# Altium PCB NeoLink Basic Main Board.PcbDoc (part 5 of 5)
Units mm, origin at the board's own origin, x right, y up, seen from the top; angles counter-clockwise.
Board outline 70 x 115 mm, 6 copper layers (Top Layer, Layer 2, Layer 3, Layer 4, Layer 5, Bottom Layer), stack 1.148 mm thick; 467 components, 265 nets, 1397 pads, 1169 vias.
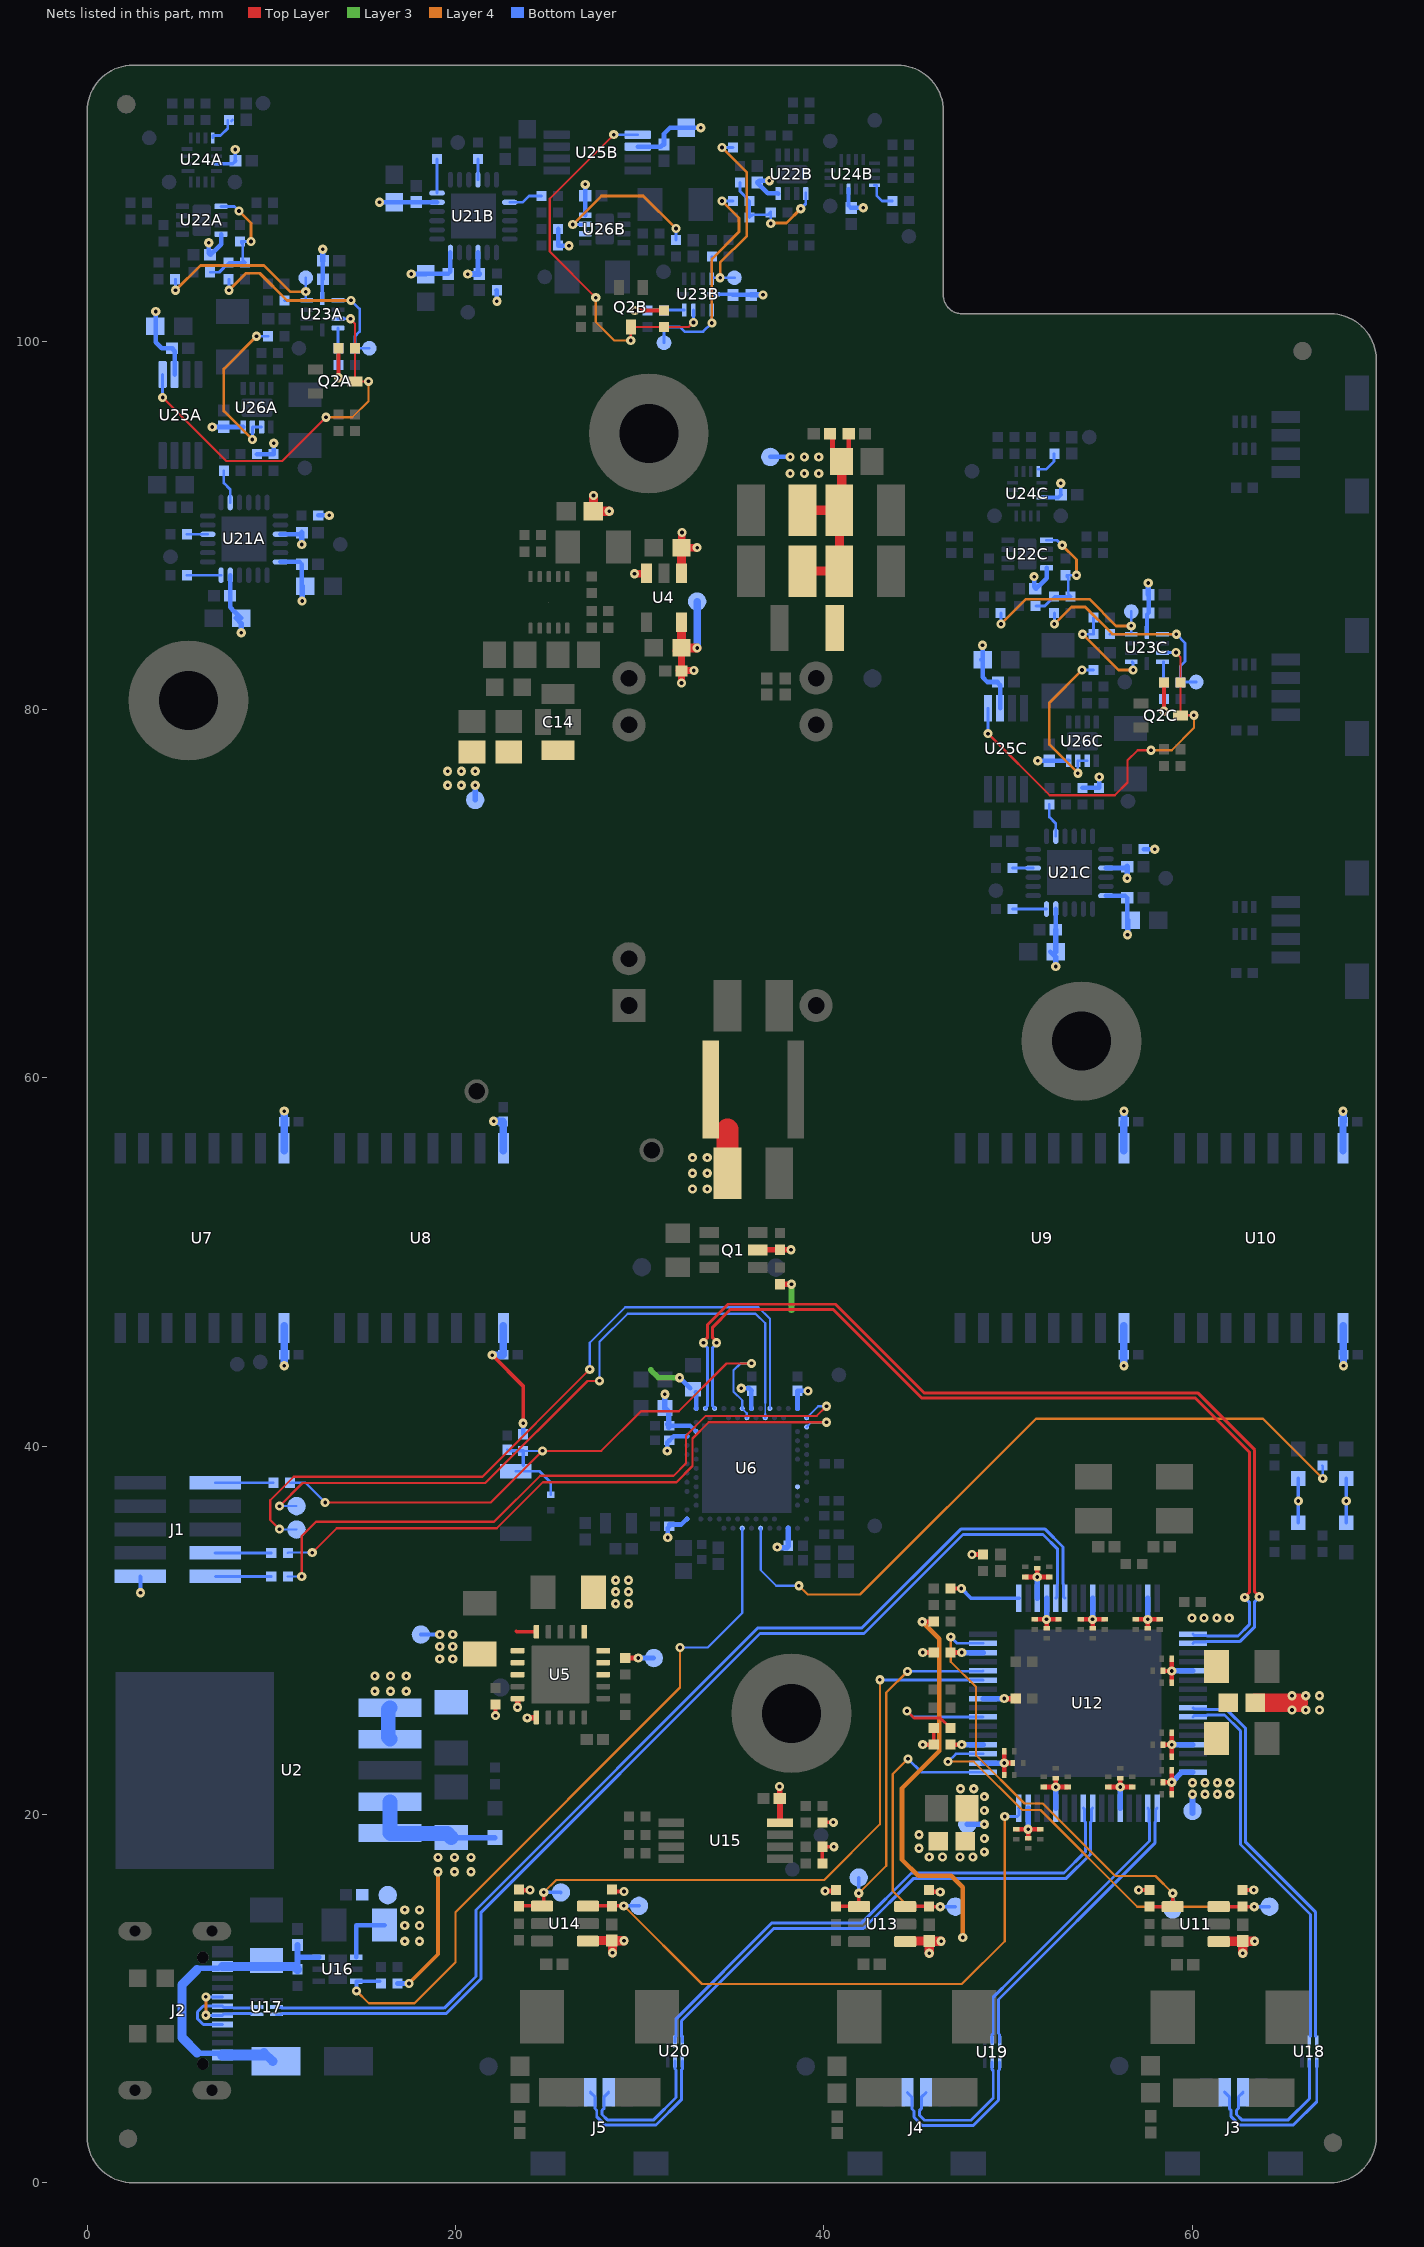
[diagram p8: the nets of this part, all layers, seen from the top]

## Via types
v1: diameter 0.5, hole 0.2, Top Layer to Bottom Layer, tented both sides, 1097 vias
v2: diameter 0.8, hole 0.4, Top Layer to Bottom Layer, tented both sides, 32 vias
v3: diameter 0.5, hole 0.2, Top Layer to Bottom Layer, 24 vias
v4: diameter 0.6, hole 0.3, Top Layer to Bottom Layer, 16 vias

## Nets (pads, with @x,y where several pads share a name; then routed paths per layer and width w, separated by ;. In a path a pad name is that pad's centre, name@x,y a point inside that pad or via, vN(x,y) a via of type N, cw(c..) or ccw(c..) an arc to the next point about the centre after c; other vN are vias at no path point) (continued)
NetR66C_2: R66C.2 R67C.1 U23C.6 | length 5.5
  Layer 4 w0.15: v1(54.05,84.1) 56,82.15 v1(56.8,82.15)
  Bottom Layer w0.15: v1(54.05,84.1) R67C.1@54.65,84.1 R66C.2@54.65,85 ; U23C.6@56.75,82.6 56.8,82.55 v1(56.8,82.15)
NetR67A_2: R67A.2 R74A.1 TP30A.1 U23A.9 | length 11.3
  Layer 4 w0.15: v1(4.8,102.775) 6.15,104.125 9.6,104.125 11.025,102.7 v1(11.875,102.7)
  Bottom Layer w0.15: v1(4.8,102.775) R74A.1@4.8,103.375 ; R67A.2@10.725,102.225 U23A.9@11.925,102.225 11.875,102.275 v1(11.875,102.7) TP30A.1@11.875,103.45
NetR67B_2: R67B.2 R74B.1 TP30B.1 U23B.9 | length 11.3
  Layer 4 w0.15: v1(34.375,103.45) 34.375,104.275 35.825,105.725 35.825,109.175 v1(34.475,110.525)
  Bottom Layer w0.15: R67B.2@33.925,104.6 U23B.9@33.925,103.4 33.975,103.45 v1(34.375,103.45) TP30B.1@35.15,103.45 ; v1(34.475,110.525) R74B.1@35.075,110.525
NetR67C_2: R67C.2 R74C.1 TP30C.1 U23C.9 | length 11.3
  Layer 4 w0.15: v1(49.625,84.65) 50.975,86 54.425,86 55.875,84.55 v1(56.7,84.55)
  Bottom Layer w0.15: v1(49.625,84.65) R74C.1@49.625,85.25 ; R67C.2@55.55,84.1 56.75,84.1 56.7,84.15 v1(56.7,84.55) TP30C.1@56.7,85.325
NetR68A_1: R68A.1 U21A.14 | length 1.9
  Bottom Layer w0.15: R68A.1@7.425,92.975 7.425,92.3 7.775,91.95 U21A.14@7.775,91.25
NetR68B_1: R68B.1 U21B.14 | length 1.9
  Bottom Layer w0.15: U21B.14@22.95,107.55 23.65,107.55 24,107.9 R68B.1@24.675,107.9
NetR68C_1: R68C.1 U21C.14 | length 1.9
  Bottom Layer w0.15: R68C.1@52.25,74.85 52.25,74.175 52.6,73.825 U21C.14@52.6,73.125
NetR70A_1: R70A.1 U21A.6 | length 1.8
  Bottom Layer w0.15: R70A.1@5.425,87.3 U21A.6@7.275,87.3
NetR70B_1: R70B.1 U21B.6 | length 1.8
  Bottom Layer w0.15: U21B.6@19,108.05 R70B.1@19,109.9
NetR70C_1: R70C.1 U21C.6 | length 1.8
  Bottom Layer w0.15: R70C.1@50.25,69.175 U21C.6@52.1,69.175
NetR73A_1: R73A.1 U21A.10 | length 1.1
  Bottom Layer w0.15: R73A.1@5.425,89.525 U21A.10@6.55,89.525
NetR73B_1: R73B.1 U21B.10 | length 1.1
  Bottom Layer w0.15: U21B.10@21.225,108.775 R73B.1@21.225,109.9
NetR73C_1: R73C.1 U21C.10 | length 1.1
  Bottom Layer w0.15: R73C.1@50.25,71.4 U21C.10@51.375,71.4
NetR76A_2: R76A.2 R80A.2 R83A.1 R85A.1 U22A.5 | length 6.9
  Layer 4 w0.15: v1(8.25,107.075) 8.9,106.425 v1@8.9,105.35
  Bottom Layer w0.15: R76A.2@6.7,103.75 7.175,103.75 7.7,104.275 8.6,104.275 8.45,104.425 8.45,105.275 R85A.1@8.375,105.35 ; U22A.5@7.275,107.325 8,107.325 v1(8.25,107.075) v1@8.237,107.075 ; R85A.1@8.375,105.425 v1(8.9,105.425)
NetR76B_2: R76B.2 R80B.2 R83B.1 R85B.1 U22B.5 | length 6.9
  Layer 4 w0.15: v1@37.125,106.425 37.975,106.425 v1(38.75,107.2)
  Bottom Layer w0.15: R76B.2@35.45,108.625 35.45,108.15 R80B.2@35.975,107.625 R83B.1@35.975,106.725 36.125,106.875 36.975,106.875 R85B.1@37.125,107.025 ; v1(37.125,106.4) R85B.1@37.125,107 ; v1(38.75,107.2) 39.025,107.475 U22B.5@39.025,108.05
NetR76C_2: R76C.2 R80C.2 R83C.1 R85C.1 U22C.5 | length 6.8
  Layer 4 w0.15: v1(52.95,88.925) 53.725,88.15 v1@53.725,87.225
  Bottom Layer w0.15: R76C.2@51.525,85.625 52,85.625 52.525,86.15 53.425,86.15 53.275,86.3 53.275,87.15 R85C.1@53.2,87.225 ; U22C.5@52.1,89.2 52.675,89.2 v1(52.95,88.925) ; R85C.1@53.2,87.3 v1(53.725,87.3)
NetR79A_2: R79A.2 R84A.1 U23A.4 | length 2
  Bottom Layer w0.15: R79A.2@13.625,98.75 R84A.1@13.625,99.625 ; R84A.1@13.625,99.625 U23A.4@13.625,100.725
NetR79B_2: R79B.2 R84B.1 U23B.4 | length 2
  Bottom Layer w0.15: R79B.2@30.45,101.7 31.325,101.7 U23B.4@32.425,101.7
NetR79C_2: R79C.2 R84C.1 U23C.4 | length 2
  Bottom Layer w0.15: R79C.2@58.45,80.625 58.45,81.5 U23C.4@58.45,82.6
NetR80A_1: R80A.1 R84A.2 TP33A.1 U23A.1 | length 12.6
  Layer 4 w0.15: v1(7.7,102.775) 8.625,103.7 9.375,103.7 10.85,102.225 v1(14.325,102.225)
  Bottom Layer w0.15: v1(7.7,102.775) R80A.1@7.7,103.375 ; U23A.1@13.625,102.225 v1@14.3,102.225 ; v1(14.325,102.225) 14.8,101.75 14.8,100.525 14.55,100.275 R84A.2@14.55,99.625 TP33A.1@15.325,99.625
NetR80B_1: R80B.1 R84B.2 TP33B.1 U23B.1 | length 12.6
  Layer 4 w0.15: v1(33.925,101) 33.925,104.475 35.4,105.95 35.4,106.7 v1(34.475,107.625)
  Bottom Layer w0.15: TP33B.1@31.325,99.925 R84B.2@31.325,100.775 32.2,100.775 32.45,100.525 33.45,100.525 v1(33.925,101) ; v1@33.925,101.025 U23B.1@33.925,101.7 ; v1(34.475,107.625) R80B.1@35.075,107.625
NetR80C_1: R80C.1 R84C.2 TP33C.1 U23C.1 | length 12.6
  Layer 4 w0.15: v1(52.525,84.65) 53.45,85.575 54.2,85.575 55.675,84.1 v1(59.15,84.1)
  Bottom Layer w0.15: v1(52.525,84.65) R80C.1@52.525,85.25 ; U23C.1@58.45,84.1 v1@59.125,84.1 ; v1(59.15,84.1) 59.625,83.625 59.625,82.625 59.375,82.375 59.375,81.5 TP33C.1@60.225,81.5
NetR86A_1: R86A.1 U26A.6 U26A.7 | length 8.8
  Layer 4 w0.15: v1(8.975,94.675) 7.425,96.225 7.425,98.5 v1(9.2,100.275)
  Bottom Layer w0.15: v1(8.975,94.675) U26A.7@8.975,95.35 U26A.6@9.475,95.35 ; v1(9.2,100.275) R86A.1@9.825,100.275
NetR86B_1: R86B.1 U26B.6 U26B.7 | length 8.8
  Layer 4 w0.15: v1(26.375,106.35) 27.925,107.9 30.2,107.9 v1(31.975,106.125)
  Bottom Layer w0.15: v1(26.375,106.35) U26B.7@27.05,106.35 U26B.6@27.05,105.85 ; R86B.1@31.975,105.5 v1(31.975,106.125)
NetR86C_1: R86C.1 U26C.6 U26C.7 | length 8.8
  Layer 4 w0.15: v1(53.8,76.55) 52.25,78.1 52.25,80.375 v1(54.025,82.15)
  Bottom Layer w0.15: v1(53.8,76.55) U26C.7@53.8,77.225 U26C.6@54.3,77.225 ; v1(54.025,82.15) R86C.1@54.65,82.15
NetR89A_1: R89A.1 U24A.8 | length 1.6
  Bottom Layer w0.15: U24A.8@6.825,111.05 6.825,111.15 6.85,111.175 7.25,111.175 7.638,111.563 R89A.1@7.638,111.988 ; R89A.1@7.838,111.963 R89A.1@7.9,112.025
NetR89B_1: R89B.1 U24B.8 | length 1.6
  Bottom Layer w0.15: U24B.8@42.75,108.475 42.85,108.475 42.875,108.45 42.875,107.925 43.175,107.625 R89B.1@43.725,107.625
NetR89C_1: R89C.1 U24C.8 | length 1.5
  Bottom Layer w0.15: U24C.8@51.65,93.05 52.075,93.05 52.5,93.475 R89C.1@52.5,93.9
OVERCUR1Z: R39.2 U12.14 | length 1.8
  Top Layer w0.25: R39.2@46.875,28.8 v1(47.5,28.8)
  Bottom Layer w0.3: v1(47.5,28.8) U12.14@48.65,28.8
OVERCUR2Z: R34.2 TP17.1 U11.4 U12.15 | length 25.5
  Top Layer w0.2: R34.2@57.7,15 U11.4@58.95,15 v1(58.95,15.725)
  Layer 4 w0.12: v1(46.9,29.65) 46.9,28.3 48.275,26.925 48.275,23.225 50.9,20.6 51.9,20.6 55.838,16.662 58.013,16.662 v1(58.95,15.725)
  Bottom Layer w0.15: v1(46.9,29.65) 47.25,29.3 U12.15@48.65,29.3
  Bottom Layer w0.2: TP17.1@58.95,14.85 v1(58.95,15.725)
OVERCUR3Z: R40.2 TP20.1 U12.12 U13.4 | length 20.1
  Top Layer w0.2: R40.2@40.693,15.018 U13.4@41.9,15.018 ; U13.4@41.9,15 U13.4@41.9,15.018 ; v1(41.9,15.725) U13.4@41.9,15.018 ; U13.4@41.943,15.018 U13.4@41.9,15.018
  Layer 4 w0.12: v1(41.9,15.725) 43.4,17.225 43.4,26.625 v1(44.55,27.775)
  Bottom Layer w0.15: v1(44.55,27.775) 44.563,27.788 48.637,27.788 U12.12@48.65,27.8
  Bottom Layer w0.2: v1(41.9,15.725) TP20.1@41.9,16.575
OVERCUR4Z: R42.2 TP23.1 U12.11 U14.4 | length 36.2
  Top Layer w0.2: R42.2@23.467,15.042 24.717,15.042 24.8,15.125 v1(24.8,15.775)
  Layer 4 w0.12: v1(24.8,15.775) 25.475,16.45 40.025,16.45 43.05,19.475 v1(43.05,27.325)
  Bottom Layer w0.15: TP23.1@25.721,15.771 TP23.1@25.725,15.775 ; v1(43.05,27.325) 43.062,27.313 48.638,27.313 U12.11@48.65,27.3
  Bottom Layer w0.2: v1(24.8,15.775) 25.718,15.775 TP23.1@25.721,15.771
POWER_EN_ISOA: Q2A.3 R4A.2 U23A.3 U25A.1 | length 21.2
  Top Layer w0.12: v1(4.1,96.95) 7.55,93.5 10.6,93.5 v1(12.975,95.875) ; v1@14.3,101.212 14.55,100.962 R4A.2@14.55,99.625 Q2A.3@14.55,97.825 v1(15.275,97.825)
  Top Layer w0.15: v1@14.3,101.212 v1(14.3,101.225)
  Layer 4 w0.12: v1(12.975,95.875) 14.4,95.875 15.275,96.75 v1(15.275,97.825)
  Bottom Layer w0.15: v1(4.1,96.95) U25A.1@4.1,98.2 ; U23A.3@13.625,101.225 v1(14.3,101.225)
POWER_EN_ISOB: Q2B.3 R4B.2 U23B.3 U25B.1 | length 21.2
  Top Layer w0.12: v1(27.625,102.375) 25.125,104.875 25.125,107.75 v1(28.6,111.225) ; Q2B.3@29.538,100.775 32.675,100.775 v1(32.925,101.025)
  Top Layer w0.15: v1(29.525,100.05) Q2B.3@29.525,100.775
  Layer 4 w0.12: v1(27.625,102.375) 27.625,101.05 28.625,100.05 v1(29.525,100.05)
  Bottom Layer w0.15: v1(28.6,111.225) U25B.1@29.9,111.225 ; v1(32.925,101.025) U23B.3@32.925,101.7
POWER_EN_ISOC: Q2C.3 R4C.2 U23C.3 U25C.1 | length 21.7
  Top Layer w0.12: v1(48.925,78.7) 52.275,75.35 55.8,75.35 56.5,76.05 56.5,77.25 57.05,77.8 v1(57.775,77.8) ; v1(59.125,83.1) 59.375,82.85 Q2C.3@59.375,79.713
  Top Layer w0.15: Q2C.3@59.375,79.7 v1(60.1,79.7)
  Layer 4 w0.12: v1(57.775,77.8) 58.9,77.8 60.1,79 v1(60.1,79.7)
  Bottom Layer w0.15: v1(48.925,78.7) U25C.1@48.925,80.075 ; U23C.3@58.45,83.1 v1(59.125,83.1)
PP_1V1: C24.1 FB3.2 R12.1 TP8.1 U5.1 U5.18 U5.19 U5.20 | length 3.9
  Top Layer w0.25: R12.1@29.225,28.5 v1(29.925,28.5)
  Top Layer w1: FB3.2@63.425,26.075 65.8,26.075
  Bottom Layer w0.25: v1(29.925,28.5) TP8.1@30.775,28.5
  other v1: 65.425,25.675 66.175,25.675 66.925,25.675 65.425,26.45 66.175,26.45 66.925,26.45 28.7,31.45 29.4,31.45 28.7,32.1 29.4,32.1 28.7,32.725 29.4,32.725
PP_1V1_USB: C79.1 C80.1 C81.1 C82.1 C83.1 C84.1 C85.1 C86.1 C87.1 C88.1 C89.1 C90.1 C91.1 C92.1 C93.1 C94.1 C95.1 C96.1 C97.1 C98.1 C99.1 C100.1 C101.1 FB3.1 TP26.1 U12.19 U12.25 U12.37 U12.45 U12.53 U12.60 U12.63 | length 21.5
  Top Layer w0.2: C88.1@58.425,27.8 v1(58.9,27.8)
  Top Layer w0.25: C95.1@50.45,19.2 v1(51.1,19.2) ; C97.1@50.95,32.9 v1(51.6,32.9) ; C80.1@51.1,18.725 v1(51.1,19.2) ; C96.1@51.6,33.375 v1(51.6,32.9) ; C81.1@51.75,19.2 v1(51.1,19.2) ; C82.1@51.95,21.5 v1(52.6,21.5) ; C98.1@52.25,32.9 v1(51.6,32.9) ; C84.1@52.6,21.975 v1(52.6,21.5) ; C83.1@53.25,21.5 v1(52.6,21.5) ; C101.1@53.95,30.6 v1(54.6,30.6) ; C99.1@54.6,30.125 v1(54.6,30.6) ; C100.1@55.25,30.6 v1(54.6,30.6) ; C86.1@55.45,21.5 v1(56.1,21.5) ; C85.1@56.1,21.975 v1(56.1,21.5) ; C87.1@56.75,21.5 v1(56.1,21.5) ; C93.1@58.425,23.8 v1(58.9,23.8) ; C91.1@58.9,23.15 C94.1@58.9,24.45 ; C90.1@58.9,27.15 C89.1@58.9,28.45
  Bottom Layer w0.3: v1(51.1,19.2) U12.63@51.1,20.35 ; U12.19@51.6,31.75 v1(51.6,32.9) ; U12.60@52.6,20.35 52.6,20.95 v1(52.6,21.5) ; v1(54.6,30.6) U12.25@54.6,31.75 ; U12.53@56.1,20.35 v1(56.1,21.5) ; v1(58.9,23.8) U12.45@60.05,23.8 ; v1(58.9,27.8) U12.37@60.05,27.8 ; TP26.1@60.025,20.075 v1(60.025,21.1)
  other v1: 60.7,21.1 61.375,21.1 62.05,21.1 60.025,21.725 60.7,21.725 61.375,21.725 62.05,21.725 60,30.675 60.65,30.675 61.35,30.675 62.025,30.675
PP_3V3: C13.1 C23.1 C27.2 C31.2 C33.2 C35.2 C38.1 C39.1 C40.1 C41.1 C42.1 C43.1 C44.1 C65.1 FB2.2 J1.1 LD1.A LD2.A LD3.A LD4.A LD5.A R8.1 R14.1 R15.1 R34.1 R39.1 R40.1 R42.1 R44.1 R49.1 R50.1 R51.1 R60.1 R93.1 R95.1 R96.1 R97.1 TP4.1 U2.4 U2.5 U5.5 U5.6 U5.7 U5.8 U5.10 U5.11 U6.A22 U6.AD14 U6.AD23 U6.B1 U6.W1 U6.Y2 U7.1 U8.1 U9.1 U10.1 U15.8 | length 61.4
  Top Layer w0.2: v1(22,44.95) 23.675,43.275 v1(23.675,41.25) ; v1(22.175,25.375) R14.1@22.175,25.975 ; 23.3,29.95 23.325,29.925 U5.5@24.4,29.925 ; R42.1@23.462,15.938 R42.1@23.487,15.913 ; v1@24.037,15.913 v1(24.05,15.9) ; U5.11@24.375,25.25 U5.11@24.4,25.275 ; R97.1@28.517,15.943 R97.1@28.585,15.875 ; R97.1@28.635,15.825 v1(29.15,15.825) v1@29.1,15.875 ; R49.1@39.925,17.35 R50.1@39.925,18.25 v1(40.55,18.25) ; R51.1@39.925,19.575 v1(40.525,19.575) ; R40.1@40.595,15.82 R40.1@40.693,15.918 ; R95.1@45.743,15.918 R95.1@45.81,15.85 ; R96.1@45.975,23.8 R44.1@45.975,24.8 ; v1@46.275,15.85 v1(46.325,15.8) ; v1(57.1,15.9) R34.1@57.7,15.9 ; R93.1@62.75,15.9 v1(63.35,15.9)
  Top Layer w0.25: R42.1@23.5,15.9 v1(24.05,15.9) ; v1(40.075,15.85) R40.1@40.575,15.85 ; v1(45.375,23.8) R96.1@45.975,23.8 ; v1(45.375,28.8) R39.1@45.975,28.8 ; R95.1@45.86,15.8 v1(46.325,15.8)
  Top Layer w0.3: v1(23.375,25.825) U5.10@23.375,26.3 ; v1(23.9,25.25) U5.11@24.375,25.25 ; v1(37.6,21.525) 37.607,21.518 37.607,20.883 C65.1@37.615,20.875 ; U15.8@37.625,19.55 C65.1@37.625,20.9 ; R8.1@37.625,48.8 v1(38.25,48.8)
  Layer 3 w0.3: 38.25,47.379 v1(38.25,48.8)
  Layer 4 w0.2: v1@17.475,10.838 19.05,12.413 v1(19.05,16.9)
  Bottom Layer w0.2: J1.1@2.88,32.94 2.9,32.92 v1(2.9,32.05) ; TP4.1@18.125,29.775 v1(19.15,29.775) ; 32.744,41.125 33.069,40.8 U6.Y2@33.075,40.8 ; LD5.A@65.775,35.85 v1(65.775,37.025) LD2.A@65.775,38.25 ; LD4.A@68.375,35.85 LD3.A@68.375,38.25
  Bottom Layer w0.25: R60.1@16.85,10.825 v1(17.475,10.825) ; R15.1@23.675,40.65 v1(23.675,41.25) ; v1(31.5,39.75) v1(31.5,39.75) ; C41.1@31.5,40.208 v1(31.5,39.75) ; C39.1@31.525,35.56 v1(31.525,35.05) v1@31.57,35.095 ; v1@31.548,39.798 v1(31.5,39.75) ; C41.1@31.548,40.258 C41.1@31.615,40.325 ; C39.1@31.57,35.605 C39.1@31.608,35.643 ; C39.1@31.608,35.743 31.615,35.75 32.27,35.75 32.57,36.05 U6.B1@32.575,36.05 ; C42.1@31.615,41.125 32.709,41.125 ; C41.1@31.625,40.315 31.86,40.55 U6.W1@32.575,40.55 ; v1(35.525,43.15) C43.1@35.95,43.15 ; C43.1@36.008,43.102 C43.1@36.1,43.01 ; U6.AD14@36.075,42.05 C43.1@36.075,43.01 ; U6.AD23@38.575,42.05 C44.1@38.575,43.01 38.58,43.005 39.145,43.005 v1(39.15,43)
  Bottom Layer w0.3: C13.1@19.775,18.75 LD1.A@22.125,18.75 ; v1(31.375,42.825) C38.1@31.375,42.075 C38.1@31.538,41.912 ; C42.1@31.538,41.202 C42.1@31.575,41.165 ; C42.1@31.575,41.045 C42.1@31.575,41.165 ; C38.1@31.575,41.755 C42.1@31.575,41.165 ; C42.1@31.615,41.125 C42.1@31.575,41.165 ; v1(37.475,34.525) 37.5,34.5 37.985,34.5 C40.1@38.075,34.59 U6.A22@38.075,35.55
  Bottom Layer w0.4: U7.1@10.69,46.55 10.695,46.545 10.695,44.38 v1(10.7,44.375) ; v1(22,44.95) C31.2@22.575,44.95 ; C31.2@22.587,44.975 22.587,46.538 U8.1@22.6,46.55 ; v1(56.3,44.375) C33.2@56.3,44.975 U9.1@56.3,46.55 ; U10.1@68.2,46.55 68.212,46.538 68.212,44.988 C35.2@68.225,44.975 v1(68.225,44.375)
  Bottom Layer w0.8: U2.5@16.45,19 U2.4@16.45,20.7 ; U2.5@16.475,18.975 19.55,18.975 C13.1@19.775,18.75
  other v1: 19.95,16.9 20.85,16.9 19.05,17.675 19.95,17.675 20.85,17.675 45.725,17.7 46.45,17.7 45.175,18.175 45.175,18.9 19.15,28.45 19.85,28.45 19.15,29.125 19.85,29.125 19.85,29.775 68.375,37.025
PP_3V3_IO_ISO: C21.1 C22.1 C26.1 C32.1 C34.1 C36.1 C110A.1 C110B.1 C110C.1 C111A.1 C111B.1 C111C.1 R61A.1 R61B.1 R61C.1 R63A.1 R63B.1 R63C.1 R64A.1 R64B.1 R64C.1 TP7.1 U4.5 U7.16 U8.16 U9.16 U10.16 U21A.24 U21B.24 U21C.24 | length 31.9
  Top Layer w0.4: C22.1@32.15,82.125 v1@32.8,82.125 ; v1(32.275,81.45) C21.1@32.275,83.2
  Top Layer w0.5: C21.1@32.05,83.2 C21.1@32.2,83.35 ; U4.5@32.275,84.75 C21.1@32.275,83.35 v1(33.125,83.35)
  Bottom Layer w0.15: C111A.1@11.535,88.025 C111A.1@11.66,87.9 ; C110A.1@11.66,86.715 C110A.1@11.675,86.7 ; C110B.1@18.4,103.65 C110B.1@18.415,103.665 ; C111B.1@19.6,103.665 C111B.1@19.725,103.79 ; C111C.1@56.36,69.9 C111C.1@56.485,69.775 ; C110C.1@56.485,68.59 C110C.1@56.5,68.575
  Bottom Layer w0.25: R64A.1@9.225,93.875 R63A.1@10.125,93.875 10.129,93.879 10.129,94.464 v1(10.132,94.468) ; U21A.24@10.5,88.025 C111A.1@11.535,88.025 ; C110A.1@11.66,86.715 C111A.1@11.66,87.9 ; R61A.1@12.55,90.55 v1(13.15,90.55) ; v1(17.6,103.655) 18.395,103.655 C110B.1@18.4,103.65 ; C110B.1@18.415,103.665 C111B.1@19.6,103.665 ; C111B.1@19.725,103.79 U21B.24@19.725,104.825 ; v1(22.25,102.175) R61B.1@22.25,102.775 ; R64B.1@25.575,106.1 R63B.1@25.575,105.2 25.579,105.196 26.164,105.196 v1(26.168,105.193) ; R64C.1@54.05,75.75 R63C.1@54.95,75.75 54.954,75.754 54.954,76.339 v1(54.957,76.343) ; U21C.24@55.325,69.9 C111C.1@56.36,69.9 ; C110C.1@56.485,68.59 C111C.1@56.485,69.775 ; R61C.1@57.375,72.425 v1(57.975,72.425)
  Bottom Layer w0.3: v1(11.675,85.9) C110A.1@11.675,86.7 ; v1(56.5,67.775) C110C.1@56.5,68.575
  Bottom Layer w0.4: U7.16@10.69,56.05 10.695,56.055 10.695,57.62 C26.1@10.7,57.625 v1(10.7,58.2) ; v1(22.075,57.65) 22.083,57.642 22.563,57.642 22.6,57.605 U8.16@22.6,56.05 ; v1(33.125,83.35) TP7.1@33.125,85.875 ; U9.16@56.3,56.05 C34.1@56.3,57.615 ; C34.1@56.305,57.62 v1(56.305,58.195) ; U10.16@68.2,56.05 C36.1@68.2,57.615 ; C36.1@68.205,57.62 v1(68.205,58.195)
  other v1: 32.95,82.125
PP_3V3_ISO: C14.3 C17.1 C18.1 C109A.1 C109B.1 C109C.1 C112A.1 C112B.1 C112C.1 C113A.1 C113B.1 C113C.1 C115A.1 C115B.1 C115C.1 C116A.1 C116B.1 C116C.1 C118A.1 C118B.1 C118C.1 C121A.1 C121B.1 C121C.1 C123A.1 C123B.1 C123C.1 C124A.1 C124B.1 C124C.1 C125A.1 C125B.1 C125C.1 R4A.1 R4B.1 R4C.1 TP5.1 U21A.5 U21A.21 U21B.5 U21B.21 U21C.5 U21C.21 U22A.8 U22B.8 U22C.8 U23A.10 U23B.10 U23C.10 U24A.11 U24B.11 U24C.11 U25A.2 U25B.2 U25C.2 U26A.8 U26B.8 U26C.8 | length 58.1
  Top Layer w0.2: v1(13.65,98.025) R4A.1@13.65,99.625 ; v1(29.738,101.675) R4B.1@31.325,101.675 R4B.1@31.338,101.675 ; v1(58.475,79.913) R4C.1@58.475,81.513
  Bottom Layer w0.2: U24A.11@7.025,109.65 7.91,109.65 C118A.1@8.06,109.8 8.043,109.817 v1(8.043,110.414) ; U23A.10@12.775,102.325 12.775,103.34 C124A.1@12.81,103.375 ; U23B.10@34.025,102.55 35.04,102.55 35.065,102.525 C124B.1@35.075,102.515 ; U24B.11@41.35,108.275 41.35,107.375 C118B.1@41.475,107.25 ; U24C.11@51.85,91.525 52.735,91.525 C118C.1@52.885,91.675 52.875,91.685 v1(52.875,92.3) ; U23C.10@57.55,84.2 57.55,84.875 57.55,85.165 C124C.1@57.635,85.25
  Bottom Layer w0.25: v1(3.725,101.625) 3.725,99.95 4.05,99.625 C116A.1@4.59,99.625 ; C116A.1@4.635,99.625 C116A.1@4.61,99.625 C116A.1@4.59,99.625 ; U25A.2@4.75,98.2 4.75,99.465 C116A.1@4.59,99.625 ; v1(6.6,105.35) 6.6,104.79 C121A.1@6.69,104.7 ; C121A.1@6.71,104.7 6.71,104.725 6.87,104.885 6.895,104.885 7.275,105.265 U22A.8@7.275,105.825 ; v1(6.8,95.35) 7.425,95.35 U26A.8@8.475,95.35 ; C113A.1@7.765,86.175 7.765,85.56 8,85.325 8.025,85.325 C112A.1@8.375,84.975 ; C113A.1@7.775,86.185 U21A.5@7.775,87.3 ; C112A.1@8.075,84.975 C112A.1@8.375,84.675 ; U21A.21@10.5,89.525 11.535,89.525 C109A.1@11.66,89.65 ; C123A.1@12.775,104.365 C123A.1@12.78,104.37 ; v1@12.775,105 v1@12.78,104.995 ; C124A.1@12.8,103.4 C123A.1@12.8,104.365 ; v1(15.875,107.55) C112B.1@16.675,107.55 16.685,107.56 C113B.1@17.875,107.56 17.88,107.555 18.995,107.555 U21B.5@19,107.55 ; C109B.1@21.225,103.665 U21B.21@21.225,104.825 ; U26B.8@27.05,106.85 C125B.1@27.05,107.9 v1(27.05,108.525) ; U25B.2@29.9,110.575 31.14,110.575 C116B.1@31.325,110.76 ; C116B.1@31.325,110.69 C116B.1@31.325,110.76 ; v1(33.325,111.6) 31.65,111.6 31.325,111.275 C116B.1@31.325,110.76 ; C124B.1@35.05,102.525 35.065,102.525 C123B.1@36.065,102.525 ; C123B.1@36.065,102.55 C123B.1@36.07,102.545 ; C121B.1@36.4,108.615 36.965,108.05 37.5,108.05 U22B.8@37.525,108.025 ; C121B.1@36.4,108.635 36.49,108.725 v1(37.05,108.725) ; v1@36.695,102.545 v1@36.7,102.55 ; C118B.1@41.475,107.25 C118B.1@41.476,107.251 ; C118B.1@41.501,107.251 v1(42.145,107.253) ; v1@42.119,107.251 v1@42.12,107.253 ; C115C.1@48.55,82.7 48.625,82.775 v1(48.625,83.5) ; C115C.1@48.625,82.7 48.625,81.75 48.875,81.5 C116C.1@49.39,81.5 ; C116C.1@49.46,81.5 C116C.1@49.39,81.5 ; U25C.2@49.575,80.075 49.575,81.315 C116C.1@49.39,81.5 ; v1(51.425,87.225) 51.425,86.665 C121C.1@51.515,86.575 ; C121C.1@51.535,86.575 51.535,86.6 51.695,86.76 51.72,86.76 52.1,87.14 U22C.8@52.1,87.7 ; v1(51.625,77.225) C125C.1@52.25,77.225 U26C.8@53.3,77.225 ; C112C.1@52.3,66.85 C112C.1@52.6,66.55 ; C112C.1@52.59,66.86 C112C.1@52.6,66.85 ; C113C.1@52.6,68.06 U21C.5@52.6,69.175 ; U21C.21@55.325,71.4 56.36,71.4 C109C.1@56.485,71.525 ; C123C.1@57.605,86.245 C123C.1@57.63,86.27 ; v1(57.625,86.875) v1@57.63,86.87 ; C124C.1@57.65,85.275 C123C.1@57.65,86.24
  Bottom Layer w0.3: v1(8.375,84.175) C112A.1@8.375,84.675 ; v1(11.655,88.97) 11.658,88.973 11.658,89.597 C109A.1@11.66,89.6 ; C123A.1@12.805,104.37 v1@12.805,104.995 ; v1(20.675,103.65) 20.682,103.657 21.292,103.657 C109B.1@21.3,103.665 ; TP5.1@21.075,75.1 v1@21.075,75.975 ; C123B.1@36.07,102.52 v1@36.695,102.52 ; C112C.1@52.59,66.86 C113C.1@52.59,68.05 ; v1(52.6,66.05) C112C.1@52.6,66.55 ; v1(56.475,70.85) 56.48,70.855 56.48,71.47 C109C.1@56.485,71.475 ; C123C.1@57.63,86.27 v1@57.63,86.87
  other v1: 19.575,75.9 20.325,75.9 21.075,75.9 19.575,76.65 20.325,76.65 21.075,76.65 36.7,102.525 12.8,105
PP_3V3_USB: C66.1 C67.1 C68.1 C69.1 C70.1 C71.1 C72.1 C73.1 C74.1 C75.1 C76.1 C77.1 C78.1 FB2.1 R94.1 TP25.1 U12.2 U12.20 U12.31 U12.48 | length 13.5
  Top Layer w0.25: v1(48.05,34.125) R94.1@48.65,34.125 ; C71.1@49.8,22.15 v1(49.8,22.8) ; C70.1@49.8,23.45 v1(49.8,22.8) ; C72.1@50.275,22.8 v1(49.8,22.8) ; C73.1@51.45,30.6 v1(52.1,30.6) ; C75.1@52.1,30.125 v1(52.1,30.6) ; C74.1@52.75,30.6 v1(52.1,30.6) ; C78.1@56.95,30.6 C76.1@58.25,30.6 ; C77.1@57.6,30.125 v1(57.6,30.6) ; C69.1@58.425,21.75 v1(58.9,21.75) ; C68.1@58.9,21.1 58.9,21.15 C67.1@58.9,22.4
  Bottom Layer w0.3: TP25.1@47.8,19.475 v1(48.725,19.475) ; U12.2@48.65,22.8 v1(49.8,22.8) ; v1(52.1,30.6) U12.20@52.1,31.75 ; v1(57.6,30.6) U12.31@57.6,31.75 ; v1(58.9,21.75) 59.45,22.3 U12.48@60.05,22.3
  other v1: 47.4,17.7 48.1,17.7 48.725,17.975 48.725,18.7 48.725,20.225 48.725,20.975 47.425,21.4 48.15,21.4
PP_5V_ISO: C5.1 C6.1 C7.1 C8.1 C9.1 C10.1 C11.1 C20.1 FB1.1 L2.2 TP2.1 U4.1 U4.3 | length 19.9
  Top Layer w0.2: U4.3@30.275,87.375 U4.3@30.3,87.4
  Top Layer w0.25: C11.1@40.34,94.975 40.475,94.84 40.475,93.975 C9.1@40.975,93.475 41.36,93.86 C10.1@41.36,94.975
  Top Layer w0.4: v1(29.725,87.375) U4.3@30.275,87.375 ; v1(32.3,89.625) 32.288,89.613 32.288,88.813 C20.1@32.275,88.8 v1(33.125,88.8)
  Top Layer w0.5: v1(27.5,91.625) 27.5,90.8 FB1.1@27.475,90.775 v1(28.35,90.775) ; U4.1@32.275,87.4 C20.1@32.275,88.8 ; C7.1@38.85,87.525 C6.1@40.85,87.525 C5.1@40.85,90.825 40.975,90.95 C9.1@40.975,93.475 ; C8.1@38.85,90.825 C5.1@40.85,90.825
  Bottom Layer w0.25: TP2.1@37.1,93.725 v1(38.175,93.725)
  other v1: 38.175,92.825 38.95,92.825 39.725,92.825 38.95,93.725 39.725,93.725
PP_5V_VBUS: C1.1 C12.1 C52.1 C56.1 C60.1 C63.1 C104.1 C105.1 L1.1 Q1.2 R2.1 R37.2 TP28.1 U2.1 U2.2 U6.AD2 U11.1 U13.1 U14.1 U16.1 | length 42
  Top Layer w0.25: v1(45.35,30.475) R37.2@45.975,30.475
  Top Layer w0.3: Q1.2@36.425,50.65 36.437,50.662 37.612,50.662 R2.1@37.625,50.675 v1(38.225,50.675)
  Top Layer w0.5: U14.1@27.235,13.16 C63.1@28.5,13.16 ; v1(28.525,12.5) 28.525,13.135 C63.1@28.5,13.16 ; v1(29.15,13.15) 28.51,13.15 C63.1@28.5,13.16 ; U13.1@44.46,13.135 C60.1@45.725,13.135 ; v1(45.725,12.475) C60.1@45.725,13.135 ; v1(46.375,13.125) 45.735,13.125 C60.1@45.725,13.135 ; U11.1@61.45,13.1 61.467,13.117 62.732,13.117 62.75,13.1 v1(62.75,12.475) ; C56.1@62.74,13.125 v1(63.4,13.125)
  Top Layer w1: 34.725,57.25 34.775,57.2
  Top Layer w1.2: C1.1@34.775,54.825 34.775,57.2
  Layer 3 w0.3: 30.6,44.15 31.025,43.725 v1(32.175,43.725)
  Layer 4 w0.25: v1(45.35,30.475) 46.275,29.55 46.275,23.45 44.25,21.425 44.25,17.55 45.125,16.675 46.925,16.675 47.55,16.05 v1(47.55,13.325)
  Bottom Layer w0.25: U16.1@14.62,12.25 14.62,14 C104.1@16.15,14 ; v1@32.223,43.677 v1(32.175,43.725) C52.1@32.754,43.146 ; C52.1@33.05,42.925 33.075,42.925 U6.AD2@33.075,42.05
  Bottom Layer w0.8: U2.2@16.45,24.1 16.35,24.2 16.35,25.7 U2.1@16.45,25.8
  other v1: 17.25,13.125 18.05,13.125 17.25,13.975 18.05,13.975 17.25,14.825 18.05,14.825 15.625,26.7 16.475,26.7 17.325,26.7 15.625,27.525 16.475,27.525 17.325,27.525 32.875,53.975 33.675,53.975 32.875,54.825 33.675,54.825 32.875,55.675 33.675,55.675
PP_VBUS_UP: C102.1 C103.1 D2.K J2.A4_B9 J2.B4_A9 R56.1 U16.6 | length 17.2
  Bottom Layer w0.3: 5.991,7.05 7.255,7.05 J2.A4_B9@7.355,6.95 ; 6.039,11.65 J2.B4_A9@7.125,11.65
  Bottom Layer w0.32: 11.425,12.25 U16.6@12.58,12.25
  Bottom Layer w0.35: R56.1@11.425,11.6 11.425,12.25 C102.1@11.425,12.91
  Bottom Layer w0.5: 5.97,7.071 5.15,7.891 5.15,10.761 5.97,11.581 ; J2.B4_A9@7.355,11.75 11.275,11.75 R56.1@11.425,11.6 ; D2.K@9.6,7.075 D2.K@10.075,6.6
  Bottom Layer w0.6: J2.A4_B9@7.355,6.95 D2.K@9.6,6.95
PRG_NRST: J1.10 R28.1 | length 3.2
  Bottom Layer w0.12: J1.10@6.95,38.02 R28.1@10.125,38.02
PRG_SWCLK: J1.4 R31.1 | length 3.1
  Bottom Layer w0.15: J1.4@6.95,34.21 R31.1@10,34.21
PRG_SWDIO: J1.2 R32.1 | length 3
  Bottom Layer w0.15: J1.2@6.965,32.925 R32.1@10,32.925
PWRCTL_POL: R98.1 U12.9 | length 1.8
  Top Layer w0.3: v1(49.8,26.3) R98.1@50.425,26.3
  Bottom Layer w0.3: U12.9@48.65,26.3 v1(49.8,26.3)
PWRON1: R96.2 U12.4 | length 1.8
  Top Layer w0.25: R96.2@46.875,23.8 v1(47.5,23.8)
  Bottom Layer w0.3: v1(47.5,23.8) U12.4@48.65,23.8
PWRON2: R93.2 TP18.1 U11.3 U12.3 | length 24.7
  Top Layer w0.2: U11.3@61.45,15 R93.2@62.75,15 v1(63.375,15)
  Layer 4 w0.12: v1(46.75,22.875) 48.15,22.875 50.775,20.25 51.775,20.25 57.025,15 v1(63.375,15)
  Bottom Layer w0.15: v1(46.75,22.875) 47.175,23.3 U12.3@48.65,23.3
  Bottom Layer w0.2: v1(63.375,15) TP18.1@64.2,15
PWRON3: R95.2 TP21.1 U12.1 U13.3 | length 17.6
  Top Layer w0.2: U13.3@44.443,15.018 R95.2@45.743,15.018 ; R95.2@45.7,15 v1(46.325,15)
  Layer 4 w0.12: v1(44.575,23.025) 43.75,22.2 43.75,15.85 44.6,15 v1(46.325,15)
  Bottom Layer w0.15: v1(44.575,23.025) 45.3,22.3 U12.1@48.65,22.3
  Bottom Layer w0.2: v1(46.325,15) TP21.1@47.15,15
PWRON4: R97.2 TP24.1 U12.64 U14.3 | length 34.1
  Top Layer w0.2: U14.3@27.217,15.042 v1(29.142,15.042)
  Layer 4 w0.12: v1(29.142,15.042) 33.385,10.8 47.5,10.8 49.825,13.125 v1(49.825,19.9)
  Bottom Layer w0.15: v1(49.825,19.9) 50.525,19.9 50.6,19.975 U12.64@50.6,20.35
  Bottom Layer w0.2: v1(29.142,15.042) TP24.1@29.968,15.042
SMBUSZ: R44.2 U12.7 | length 7
  Top Layer w0.15: v1(44.525,25.625) 44.9,25.25 46.325,25.25 R44.2@46.875,24.7
  Bottom Layer w0.15: v1(44.525,25.625) 44.85,25.3 U12.7@48.65,25.3
SOC_ANT: U6.H23
SOC_NRST: C30.1 D1.K R15.2 R28.2 SW1.1 U6.AC13 U6.AD12 | length 38.1
  Top Layer w0.12: v1(12.925,36.95) 21.925,36.95 v1(24.725,39.75) 27.925,39.75 30.075,41.9 32.125,41.9 34.725,44.5 v1(36.075,44.5)
  Bottom Layer w0.12: R28.2@11.025,38.02 11.855,38.02 v1(12.925,36.95) ; R15.2@23.675,39.75 v1(24.725,39.75) ; U6.AC13@35.825,41.55 35.825,41.792 35.575,42.042 U6.AD12@35.575,42.05 35.575,42.492 35.094,42.973 35.094,44.119 35.475,44.5 v1(36.075,44.5)
  Bottom Layer w0.15: C30.1@22.825,39.81 C30.1@22.885,39.75 ; SW1.1@23.275,38.65 24.55,38.65 25.175,38.025 D1.K@25.175,37.37
  Bottom Layer w0.2: C30.1@22.885,39.75 R15.2@23.675,39.75 SW1.1@23.675,38.975
SOC_SWCLK: R31.2 U6.AA24 | length 34.2
  Top Layer w0.12: v1(12.225,34.225) 13.55,35.55 22.25,35.55 24.75,38.05 32,38.05 32.875,38.925 32.875,40.425 33.75,41.3 v1(40.15,41.3)
  Bottom Layer w0.12: R31.2@10.9,34.21 10.915,34.225 v1(12.225,34.225) ; U6.AA24@39.075,41.05 39.325,41.3 v1(40.15,41.3)
SOC_SWDIO: R32.2 U6.AC24 | length 36.6
  Top Layer w0.12: v1(11.65,32.925) 11.65,35.125 12.425,35.9 22.1,35.9 24.6,38.4 31.85,38.4 32.525,39.075 32.525,40.575 33.6,41.65 39.625,41.65 v1(40.15,42.175)
  Bottom Layer w0.12: R32.2@10.9,32.925 v1(11.65,32.925) ; U6.AC24@39.075,41.55 39.7,42.175 v1(40.15,42.175)
TEST: R46.1 U12.17 | length 3.9
  Top Layer w0.2: R46.1@46.875,32.275 v1(47.475,32.275)
  Bottom Layer w0.2: v1(47.475,32.275) 48,31.75 U12.17@50.6,31.75
UART_DBG_RX: TP14.1 U6.AD18 | length 40.2
  Top Layer w0.12: v1(10.45,35.5) 9.95,36 9.95,37.075 11.225,38.35 21.475,38.35 v1(27.3,44.175)
  Bottom Layer w0.12: v1(10.45,35.5) 10.462,35.488 11.362,35.488 TP14.1@11.375,35.475 ; v1(27.3,44.175) 27.3,45.625 29.225,47.55 36.45,47.55 37.08,46.92 37.08,42.055 U6.AD18@37.075,42.05
UART_DBG_TX: TP15.1 U6.AC17 | length 38.2
  Top Layer w0.12: v1(10.45,36.75) 11.7,38 21.625,38 27.175,43.55 v1(27.825,43.55)
  Bottom Layer w0.076: 36.825,41.75 36.825,42.35
  Bottom Layer w0.12: v1(10.45,36.75) TP15.1@11.375,36.75 ; v1(27.825,43.55) 27.825,45.675 29.35,47.2 36.3,47.2 36.825,46.675 36.825,42.35 ; U6.AC17@36.825,41.55 36.825,41.75
USB_DN2.DN_N: U12.42 U18.5 | length 21.1
  Bottom Layer w0.161: U12.42@60.05,25.3 60.119,25.369 60.777,25.369 60.814,25.406 61.769,25.406 62.625,24.55 62.625,18.375 66.428,14.572 U18.5@66.428,7.963
USB_DN2.DN_P: U12.41 U18.6 | length 21.6
  Bottom Layer w0.161: U12.41@60.05,25.8 60.119,25.731 60.777,25.731 60.814,25.694 61.888,25.694 62.913,24.669 62.913,18.494 66.716,14.691 U18.6@66.716,7.963
USB_DN2_N: J3.2 U18.2 | length 7.9
  Bottom Layer w0.161: J3.2@62.775,4.924 62.525,4.674 62.525,4.05 62.413,3.938 62.413,3.712 62.7,3.425 65.225,3.425 66.372,4.572 U18.2@66.372,6.607
USB_DN2_P: J3.3 U18.1 | length 9
  Bottom Layer w0.161: J3.3@61.775,4.924 62.025,4.674 62.025,4.031 62.125,3.931 62.125,3.593 62.581,3.137 65.503,3.137 66.772,4.407 U18.1@66.772,6.607
USB_DN3.DN_N: U12.50 U19.5 | length 16.3
  Bottom Layer w0.161: U19.5@49.15,7.625 49.15,8.056 49.206,8.112 49.206,10.081 50.253,11.128 ; 50.225,11.1 57.692,18.567 57.692,19.561 57.669,19.584 57.669,20.281 U12.50@57.6,20.35
USB_DN3.DN_P: U12.49 U19.6 | length 16.3
  Bottom Layer w0.161: U19.6@49.55,7.625 49.55,8.056 49.494,8.112 49.494,9.962 57.98,18.448 57.98,19.572 58.031,19.623 58.031,20.281 U12.49@58.1,20.35
USB_DN3_N: J4.2 U19.2 | length 8
  Bottom Layer w0.161: J4.2@45.55,4.9 45.3,4.65 45.3,4.027 45.188,3.915 45.188,3.688 45.475,3.402 48,3.402 49.206,4.607 49.206,6.089 49.15,6.145 U19.2@49.15,6.575
USB_DN3_P: J4.3 U19.1 | length 8.9
  Bottom Layer w0.161: J4.3@44.55,4.9 44.8,4.65 44.8,4.008 44.9,3.907 44.9,3.569 45.356,3.114 48.119,3.114 48.963,3.957 49.494,4.488 49.494,6.089 49.55,6.145 U19.1@49.55,6.575
USB_DN4.DN_N: U12.57 U20.5 | length 29.7
  Bottom Layer w0.161: U20.5@31.922,7.662 31.922,7.912 31.987,7.977 31.987,8.919 37.168,14.1 42.043,14.1 44.768,16.825 53.05,16.825 54.206,17.981 54.206,19.586 54.17,19.623 54.17,20.281 U12.57@54.1,20.35
USB_DN4.DN_P: U12.56 U20.6 | length 29.7
  Bottom Layer w0.161: U20.6@32.322,7.662 32.322,7.912 32.275,7.96 32.275,8.8 37.287,13.812 42.162,13.812 44.887,16.537 53.169,16.537 54.494,17.862 54.494,19.586 54.531,19.623 54.531,20.281 U12.56@54.6,20.35
USB_DN4_N: J5.2 U20.2 | length 8
  Bottom Layer w0.161: J5.2@28.325,4.925 28.075,4.675 28.075,4.052 27.963,3.94 27.963,3.713 28.25,3.427 30.775,3.427 31.978,4.63 31.978,6.126 31.922,6.182 U20.2@31.922,6.612
USB_DN4_P: J5.3 U20.1 | length 8.9
  Bottom Layer w0.161: J5.3@27.325,4.925 27.575,4.675 27.575,4.033 27.675,3.932 27.675,3.594 28.131,3.139 30.894,3.139 32.266,4.51 32.266,6.126 32.322,6.182 U20.1@32.322,6.612
USB_nRF.SOC_N: U6.AD4 U12.34 | length 51.8
  Top Layer w0.161: v1(33.475,45.625) 33.475,45.683 33.681,45.889 33.681,46.588 34.806,47.713 40.637,47.713 45.45,42.9 60.307,42.9 63.4,39.807 63.4,32.089 63.65,31.839 v1(63.65,31.825)
  Bottom Layer w0.161: v1(33.475,45.625) 33.475,45.567 33.681,45.361 33.681,44.756 33.681,42.187 33.575,42.081 U6.AD4@33.575,42.05 ; U12.34@60.05,29.3 60.119,29.369 60.777,29.369 60.814,29.406 62.613,29.406 63.4,30.193 63.4,31.561 63.65,31.811 v1(63.65,31.825)
USB_nRF.SOC_P: U6.AD6 U12.33 | length 50.3
  Top Layer w0.161: v1(34.175,45.625) 34.175,45.683 33.969,45.889 33.969,46.469 34.925,47.425 40.518,47.425 45.331,42.612 60.188,42.612 63.112,39.688 63.112,32.057 62.862,31.807 v1(62.862,31.793)
  Bottom Layer w0.161: U6.AD6@34.075,42.05 34.075,42.081 33.969,42.187 33.969,44.875 33.969,45.361 34.175,45.567 v1(34.175,45.625) ; U12.33@60.05,29.8 60.119,29.731 60.777,29.731 60.814,29.694 62.494,29.694 63.112,30.312 63.112,31.529 62.862,31.779 v1(62.862,31.793)
USB_UP.UP_N: U12.22 U17.5 | length 58.9
  Bottom Layer w0.161: U17.5@10.275,9.531 10.545,9.531 10.587,9.488 19.388,9.488 21.112,11.212 21.112,14.819 36.418,30.125 42.068,30.125 47.443,35.5 52.025,35.5 52.994,34.531 52.994,32.514 53.031,32.477 53.031,31.82 U12.22@53.1,31.75
USB_UP.UP_P: U12.21 U17.6 | length 58.4
  Bottom Layer w0.161: U17.6@10.275,9.131 10.506,9.131 10.575,9.2 19.507,9.2 21.4,11.093 21.4,14.7 36.537,29.837 42.187,29.837 47.562,35.212 51.906,35.212 52.706,34.412 52.706,32.514 52.67,32.477 52.67,31.82 U12.21@52.6,31.75
USB_UP_CON_N: J2.A7 J2.B7 U17.2 | length 4.9
  Bottom Layer w0.161: J2.B7@7.355,8.6 6.313,8.6 6,8.913 6,9.287 6.313,9.6 J2.A7@7.355,9.6 7.424,9.53 7.907,9.53 7.944,9.494 U17.2@8.9,9.494
USB_UP_CON_P: J2.A6 J2.B6 U17.1 | length 4.4
  Layer 4 w0.161: v1(6.45,9.1) v1(6.45,10.1)
  Bottom Layer w0.161: v1(6.45,9.1) J2.A6@7.355,9.1 7.424,9.169 7.907,9.169 7.944,9.206 U17.1@8.9,9.206 ; v1(6.45,10.1) J2.B6@7.355,10.1
USB_VBUS_FAULT: R60.2 U6.A12 U16.3 | length 39.3
  Layer 4 w0.12: v1(14.625,10.425) 15.3,9.75 17.775,9.75 20,11.975 20,14.7 32.2,26.9 v1(32.2,29.075)
  Bottom Layer w0.12: v1(32.2,29.075) 33.7,29.075 35.575,30.95 U6.A12@35.575,35.55
  Bottom Layer w0.2: v1(14.625,10.425) 14.625,10.945 U16.3@14.62,10.95 R60.2@15.875,10.95
VCOM_LED_IND: R17.2 U6.A16 | length 39.4
  Layer 4 w0.12: v1(38.65,32.425) 39.125,31.95 41.975,31.95 51.525,41.5 63.85,41.5 v1(67.1,38.25)
  Bottom Layer w0.12: U6.A16@36.575,35.55 36.575,33.275 37.425,32.425 v1(38.65,32.425) ; R17.2@67.075,38.95 67.1,38.925 v1(67.1,38.25)
pads on no net: D6.3 D6.5 D7.3 D7.5 D8.3 D8.5 FD1. FD2. FD3. FD4. FD5. FD6. FD7. FD8. J1.6 J1.7 J1.8 J2. J2.A8 J2.B8 MH1.MH MH2.MH MH3.MH MH4.MH U1.7 U1.8 U4.4 U6.A18 U6.A20 U6.AB2 U6.AC9 U6.AC15 U6.AD8 U6.B9 U6.B19 U6.M2 U6.T2 U6.U1 U9.7 U9.10 U12.23 U12.24 U12.26 U12.27 U12.28 U12.35 U12.36 U12.38 U12.39 U12.40 U12.43 U12.44 U12.46 U12.47 U12.51 U12.52 U12.54 U12.55 U12.58 U12.59 U12.61 U12.62 U21A.12 U21A.13 U21B.12 U21B.13 U21C.12 U21C.13 U23A.2 U23A.8 U23B.2 U23B.8 U23C.2 U23C.8 U24A.2 U24A.10 U24B.2 U24B.10 U24C.2 U24C.10
copper on no net:
  other v2: 38.251,23 36.483,23.732 40.019,23.732 35.751,25.5 40.751,25.5 36.483,27.268 40.019,27.268 38.251,28 54,59.5 52.232,60.232 55.768,60.232 51.5,62 56.5,62 52.232,63.768 55.768,63.768 54,64.5 5.501,77.999 3.733,78.731 7.269,78.731 3.001,80.499 8.001,80.499 3.733,82.267 7.269,82.267 5.501,82.999 30.501,92.499 28.733,93.231 32.269,93.231 28.001,94.999 33.001,94.999 28.733,96.767 32.269,96.767 30.501,97.499

## Polygon pours and split planes (outlines as drawn)
GND_ISO on Bottom Layer "L2-GND" (solid, remove dead copper, pour order 50): 0,75.625 0,55.1 0.1,55.1 23.35,55.1 24.025,55.775 24.025,74.675 25.125,75.775 43.825,75.775 45,74.6 45,55.775 45.675,55.1 70,55.1 70,75.625 70,112.5 ccw(c67.5,112.5) 67.5,115 2.5,115 ccw(c2.5,112.5) 0,112.5
GND on Bottom Layer "L2-GND" (solid, remove dead copper, pour order 40): 0,47.5 26,47.5 28.275,49.775 28.275,67.625 40.75,67.625 40.75,49.7 42.95,47.5 70,47.5 70,2.504 70,2.5 cw(c67.5,2.5) 67.5,0 2.5,0 cw(c2.5,2.5) 0,2.5
PP_VBUS_UP on Bottom Layer "L2-GND" (solid, remove dead copper, pour order 0): 10.9,11.3 10.9,10.825 8.45,10.825 8.275,11 8.275,11.324 8.151,11.45 7.85,11.45 7.85,12.05 8.15,12.05 8.275,12.175 8.275,13 8.525,13.25 11.75,13.25 11.75,11.3
PP_5V_VBUS on Bottom Layer "L2-GND" (solid, pour order 1): 14.8,15.075 14.3,15.075 14.3,12.1 15.3,12.1 15.425,12.225 18.275,12.225 18.675,12.625 18.675,15.8 18.275,16.2 14.8,16.2
GND_ISO on Top Layer "L2-GND" (solid, remove dead copper, pour order 43): 0,75.625 0,55.1 0.1,55.1 23.35,55.1 24.025,55.775 24.025,74.675 24.975,75.625 43.975,75.625 45,74.6 45,55.775 45.675,55.1 70,55.1 70,75.625 70,112.5 ccw(c67.5,112.5) 67.5,115 2.5,115 ccw(c2.5,112.5) 0,112.5
GND on Top Layer "L2-GND" (solid, remove dead copper, pour order 39): 0,47.5 26,47.5 28.275,49.775 28.275,67.625 40.75,67.625 40.75,49.7 42.95,47.5 70,47.5 70,2.504 70,2.5 cw(c67.5,2.5) 67.5,0 2.5,0 cw(c2.5,2.5) 0,2.5
PP_5V_ISO on Top Layer "L2-GND" (solid, pour order 8): 39.425,83.3 39.75,82.975 41.625,82.975 42.175,83.525 42.175,92.125 41.65,92.65 41.65,95.325 40.65,95.325 39.737,94.412 38.137,94.412 37.475,93.75 37.475,86.225 37.7,86 38.9,86 39.425,85.475
PP_1V1 on Top Layer "L2-GND" (solid, pour order 21): 29.875,28.25 29.875,32.8 29.475,33.2 27.25,33.2 26.85,32.8 26.85,29.55 27.525,29.55 27.65,29.425 27.65,27.475 27.675,27.45 28.375,27.45 27.675,27.45 29.075,27.45
DN2_VBUS on Top Layer "L2-GND" (solid, pour order 2): 59.475,13.4 59.55,13.325 59.55,11.3 60.15,10.7 60.15,7.475 58.475,5.8 57.225,5.8 57.225,11.725 58.35,12.85 58.35,13.325 58.425,13.4
GND_ISO on Top Layer "L2-GND" (solid, pour order 11): 19.15,78.625 25.175,78.625 25.175,80.025 19.15,80.025
PP_3V3_ISO on Top Layer "L1-PP-3V3-ISO" (solid, pour order 12): 26.475,78.325 19.15,78.325 19.15,75.45 23.65,75.45 24.875,76.675 26.475,76.675
PP_3V3 on Top Layer "L2-GND" (solid, pour order 20): 23.725,27.45 23.75,27.475 23.75,29.175 24.125,29.55 24.525,29.55 24.55,29.575 24.55,30.275 24.525,30.3 19.05,30.3 18.75,30 18.75,27.75 19.05,27.45
NetC15_1 on Top Layer "L2-GND" (solid, pour order 9): 25.475,86.9 26.725,86.9 26.925,87.1 26.925,89.575 26.75,89.75 24.375,89.75 24.375,89.2 25,89.2 25.4,88.8 25.4,86.975
PP_3V3 on Top Layer "L2-GND" (solid, pour order 16): 45.05,17.35 44.775,17.625 44.775,19.075 45,19.3 46.8,19.3 46.8,17.35
PP_3V3_USB on Top Layer "L2-GND" (solid, pour order 13): 47.125,21.7 48.8,21.7 49.075,21.425 49.075,17.675 48.75,17.35 47.125,17.35
NetC14_1 on Top Layer "L2-GND" (solid, pour order 10): 26.15,84.75 26.2,84.7 26.2,82.25 26.6,81.85 26.6,80.45 26.45,80.3 24.7,80.3 24.55,80.45 24.55,81.85 24.95,82.25 24.95,84.7 25,84.75
NetC3_1 on Top Layer "L2-GND" (solid, pour order 7): 39.125,83 38.225,82.1 38.225,81.35 35.475,81.35 35.475,85.175 36,85.7 38.8,85.7 39.125,85.375
PP_1V1_USB on Top Layer "B.Cu--5" (solid, remove dead copper, pour order 6): 59.55,20.625 62.5,20.625 62.5,31.075 59.55,31.075
DN4_VBUS on Top Layer "L2-GND" (solid, pour order 5): 25.225,13.425 25.3,13.35 25.3,11.325 25.9,10.725 25.9,7.5 24.225,5.825 22.975,5.825 22.975,11.75 24.1,12.875 24.1,13.35 24.175,13.425
DN3_VBUS on Top Layer "L2-GND" (solid, pour order 4): 42.45,13.4 42.525,13.325 42.525,11.3 43.125,10.7 43.125,7.475 41.45,5.8 40.2,5.8 40.2,11.725 41.325,12.85 41.325,13.325 41.4,13.4
GND_ISO on Layer 5 "L2-GND" (solid, pour order 18): 0,75.625 0,55.1 0.1,55.1 23.35,55.1 24.025,55.775 24.025,74.675 24.975,75.625 43.975,75.625 45,74.6 45,55.775 45.675,55.1 70,55.1 70,75.625 70,112.5 ccw(c67.5,112.5) 67.5,115 2.5,115 ccw(c2.5,112.5) 0,112.5
GND on Layer 5 "L2-GND" (solid, pour order 17): 0,47.5 26,47.5 28.275,49.775 28.275,67.625 40.75,67.625 40.75,49.7 42.95,47.5 70,47.5 70,2.504 70,2.5 cw(c67.5,2.5) 67.5,0 2.5,0 cw(c2.5,2.5) 0,2.5
PP_3V3_ISO on Layer 3 "L2-GND" (solid, pour order 35): 0,75.625 0,55.1 0.1,55.1 23.35,55.1 24.025,55.775 24.025,74.675 24.975,75.625 43.975,75.625 45,74.6 45,55.775 45.675,55.1 70,55.1 70,75.625 70,112.5 ccw(c67.5,112.5) 67.5,115 2.5,115 ccw(c2.5,112.5) 0,112.5
PP_3V3_IO_ISO on Layer 3 "L2-GND" (solid, pour order 32): 61.975,61.125 70,61.125 70,55.1 45.675,55.1 45,55.775 45,74.6 43.975,75.625 24.975,75.625 24.025,74.675 24.025,55.775 23.35,55.1 0,55.1 0,55.154 0,71.425 17.675,71.425 25.1,78.85 25.1,85.45 33.9,85.45 35.8,83.55 42.25,83.55 45.525,80.275 49.15,76.65 49.15,61.6 52.25,58.5 55.7,58.5 57.6,60.4 57.6,63.55 55.875,65.275 55.875,69.375 57.225,70.725 57.225,72.85 54.55,75.525 54.55,76.5 54.85,76.8 57.275,76.8 60.275,73.8 60.275,62.825
PP_3V3 on Layer 3 "L2-GND" (solid, pour order 29): 0,47.5 26,47.5 42.95,47.5 70,47.5 70,2.504 70,2.5 cw(c67.5,2.5) 67.5,0 2.5,0 cw(c2.5,2.5) 0,2.5
PP_5V_VBUS on Layer 3 "L2-GND" (solid, pour order 25): 20.225,13.65 18.25,15.625 18.25,31.7 34.35,47.8 39.725,47.8 40.75,48.825 40.75,51.125 40.75,61.15 39.875,62.025 29.1,62.025 28.275,61.2 28.275,49.75 13.575,35.05 13.575,13.55 17.25,9.875 63.575,9.875 64.15,10.45 64.15,13.1 63.6,13.65
PP_3V3_IO_ISO on Layer 3 "L2-GND" (solid, pour order 33): 22.45,102.475 21.55,102.475 20.5,102.475 18.825,104.15 17.425,104.15 16.5,103.225 16.5,97.6 13.875,94.975 10.15,94.975 9.275,94.1 9.275,92.5 11.625,90.15 13.1,90.15 13.425,89.825 13.425,88.5 12.925,88 10.4,88 10.1,87.7 10.1,86.7 11.45,85.35 14.3,85.35 17.425,82.225 23.9,82.225 27.025,79.1 31.075,79.1 31.075,85.45 27.5,85.45 25.775,87.175 25.775,91.9 26.7,92.825 26.7,105.15 26.325,105.525 25.5,105.525
PP_5V_ISO on Layer 3 "L2-GND" (solid, pour order 31): 26.564,92.2 28.25,92.2 29.025,91.425 32.025,91.425 35.925,95.325 41.15,95.325 43.075,93.4 43.075,84.625 42.3,83.85 35.925,83.85 34.025,85.75 27.625,85.75 26.075,87.3 26.075,91.75 26.525,92.2
PP_1V1 on Layer 3 "L2-GND" (solid, pour order 26): 27.725,30.9 27.725,33.375 28.175,33.825 42.375,33.825 47.125,38.575 63.5,38.575 67.45,34.625 67.45,25.65 67,25.2 63.85,25.2 63.4,25.65 63.4,33.35 61.45,35.3 47.825,35.3 42.925,30.4 28.225,30.4
PP_1V1_USB on Layer 3 "L2-GND" (solid, pour order 23): 61.325,35 63.1,33.225 63.1,20.025 61.65,18.575 50.9,18.575 50.375,19.1 50.375,21.075 51.35,22.05 56.075,22.05 57.375,20.75 59.1,20.75 59.6,21.25 59.6,22.55 58.5,23.65 58.5,31 58.15,31.35 56.55,31.35 55.35,30.15 53.975,30.15 52.775,31.35 51.425,31.35 51.075,31.7 51.075,34.775 51.3,35
PP_3V3_USB on Layer 3 "L2-GND" (solid, pour order 24): 58,31.05 58.2,30.85 58.2,23.525 59.3,22.425 59.3,21.375 59.025,21.1 57.45,21.1 56.2,22.35 51.15,22.35 50,21.2 50,17.325 49.7,17.025 47.425,17.025 47.025,17.425 47.025,22.425 47.025,34.075 47.95,35 50.475,35 50.775,34.7 50.775,31.55 51.275,31.05 52.65,31.05 53.775,29.925 55.55,29.925 56.675,31.05
GND_ISO on Layer 2 "L2-GND" (solid, remove dead copper, pour order 46): -0.003,75.621 -0.003,55.096 0.097,55.096 23.347,55.096 24.022,55.771 24.022,74.671 24.972,75.621 43.972,75.621 44.997,74.596 44.997,55.771 45.672,55.096 69.997,55.096 69.997,75.621 69.997,112.496 ccw(c67.497,112.496) 67.497,114.996 2.497,114.996 ccw(c2.497,112.496) -0.003,112.496
GND on Layer 2 "L2-GND" (solid, pour order 37): 0,47.5 26,47.5 28.275,49.775 28.275,67.625 40.75,67.625 40.75,49.7 42.95,47.5 70,47.5 70,2.504 70,2.5 cw(c67.5,2.5) 67.5,0 2.5,0 cw(c2.5,2.5) 0,2.5
GND_ISO on Layer 4 "L2-GND" (solid, remove dead copper, pour order 48): 0,75.625 0,55.1 0.1,55.1 23.35,55.1 24.025,55.775 24.025,74.675 24.975,75.625 43.975,75.625 45,74.6 45,55.775 45.675,55.1 70,55.1 70,75.625 70,112.5 ccw(c67.5,112.5) 67.5,115 2.5,115 ccw(c2.5,112.5) 0,112.5
GND on Layer 4 "L2-GND" (solid, remove dead copper, pour order 41): 0,47.5 26,47.5 28.275,49.775 28.275,67.625 40.75,67.625 40.75,49.7 42.95,47.5 70,47.5 70,2.504 70,2.5 cw(c67.5,2.5) 67.5,0 2.5,0 cw(c2.5,2.5) 0,2.5

## Keep-outs
Keep-Out Layer:
  circle w0.1: c6.28,6.46 r0.275
  circle w0.1: c6.28,12.24 r0.275
  region: 46.525,55.35 70,55.35 70,47.25 43.25,47.25 40.625,49.875 40.625,67.625 28.425,67.625 28.425,49.925 25.75,47.25 0,47.25 0.005,55.35 22.925,55.35 23.35,55.775 23.35,74 25.1,75.75 43.875,75.75 45.825,73.8 45.825,56.05

## Other copper
Top Layer:
  rectangle net NetC106_1: 58.975,3.3 61.625,4.25
  rectangle net NetC108_1: 24.525,3.3 27.175,4.25
  rectangle net NetC107_1: 41.75,3.3 44.4,4.25
  region net GND: 36.825,53.425 39.8,53.425 40.075,53.7 40.075,55.95 39.8,56.225 36.825,56.225
  region net GND: 62.925,4.25 62.925,3.3 65.575,3.3 65.575,4.25
  region net GND: 45.7,4.275 45.7,3.325 48.35,3.325 48.35,4.275
  region net GND: 28.475,4.275 28.475,3.325 31.125,3.325 31.125,4.275
  region net NetC108_1: 27.175,5.495 27.175,6.725 25.95,6.725 25.95,5.495
  region net NetC107_1: 44.4,5.5 44.4,6.7 43.175,6.7 43.175,5.5
  region net NetC106_1: 61.625,5.475 61.625,6.725 60.4,6.725 60.4,5.475
  pour cut-out: 23.75,28.675 24.65,29.575 24.65,30.325 24.75,30.425 26.5,30.425 26.55,30.375 26.55,29.625 26.625,29.55 27.525,29.55 27.65,29.425 27.65,24.025 24.775,24.025 24.625,24.175 24.625,24.425 24.4,24.65 23.975,24.65 23.75,24.875
  region net PP_1V1: 65.375,26.875 65.05,26.55 65.05,25.575 65.375,25.25 67,25.25 67.275,25.525 67.275,26.6 67,26.875
  region net PP_5V_VBUS: 35.525,56.225 32.55,56.225 32.275,55.95 32.275,53.7 32.55,53.425 35.525,53.425
  region net GND_ISO: 23.875,86.2 23.425,86.2 ccw(c23.425,86.15) 23.375,86.15 23.375,86 ccw(c23.425,86) 23.425,85.95 23.875,85.95 23.875,85.7 23.425,85.7 ccw(c23.425,85.65) 23.375,85.65 23.375,85.5 ccw(c23.425,85.5) 23.425,85.45 23.875,85.45 23.875,85.05 ccw(c23.925,85.05) 23.925,85 26.225,85 ccw(c26.225,85.05) 26.275,85.05 26.275,85.45 26.725,85.45 ccw(c26.725,85.5) 26.775,85.5 26.775,85.65 ccw(c26.725,85.65) 26.725,85.7 26.275,85.7 26.275,85.95 26.725,85.95 ccw(c26.725,86) 26.775,86 26.775,86.15 ccw(c26.725,86.15) 26.725,86.2 26.275,86.2 26.275,86.6 ccw(c26.225,86.6) 26.225,86.65 23.925,86.65 ccw(c23.925,86.6) 23.875,86.6
Bottom Layer:
  region net GND: 14.5,23.4 14.5,21.4 20.675,21.4 20.675,23.4 18.3,23.4
  pour cut-out: 25.375,109.05 25.375,108.799 25.625,108.799 25.625,109.05
  region net PP_VBUS_UP: 11.75,11.25 11.075,11.25 10.9,11.075 10.9,10.825 8.45,10.825 8.275,11 8.275,13 8.525,13.25 11.75,13.25
  pour cut-out: 51.1,75.8 51.1,75.55 51.351,75.55 51.351,75.8 51.1,75.8
  pour cut-out: 6.275,93.975 6.275,93.65 6.525,93.65 6.525,93.975
  pour cut-out: 33.4,41.225 38.25,41.225 38.25,36.375 33.4,36.375
  region net PP_5V_VBUS: 14.75,23.6 18.45,23.6 18.45,24.675 18.9,25.125 20.625,25.125 20.85,25.35 20.85,27.325 20.175,28 15.45,28 14.75,27.3
  region net PP_3V3: 14.75,21.2 14.75,17.225 15.5,16.475 21.125,16.475 21.4,16.75 21.4,19.525 21.125,19.8 18.85,19.8 18.45,20.2 18.45,21.2

## Silkscreen, mask and mechanical layers (free items; w line width, h text height)
Top Overlay:
  text "'.ProjectCode'-'.PCBNo'-'.PCBRev'" at 5.125,66.353 h1.8
Bottom Overlay:
  text "ECG+ / ECG- / RLD / GND" at 61.45,92.391 h1.2
  text "CH2" at 67.863,88.113 h2.5
  text "CH1" at 67.85,74.95 h2.5
  text "CH3" at 67.85,61.776 h2.5
  text "USB4" at 23.1,1.651 h2.5
  text "USB3" at 40.325,1.651 h2.5
  text "USB2" at 57.65,1.476 h2.5
Board Outline:
  lines w0.1: 23.935,48.35 23.935,74.175 cw(c24.792,74.187) 25.65,74.189 25.65,48.375 ; 23.935,48.372 ccw(c24.793,48.373) 25.65,48.386 ; 44.599,48.208 cw(c43.641,48.236) 42.684,48.204 42.685,74.675 cw(c43.643,74.646) 44.6,74.679 ; 44.6,48.225 44.6,74.675 ; 0,2.5 ccw(c2.499,2.499) 2.5,0 ; 0,2.5 0,112.5 ; 0,2.5 0,112.5 ; 0,112.5 cw(c2.499,112.501) 2.5,115 ; 0,112.5 cw(c2.499,112.501) 2.5,115 ; 2.5,0 67.5,0 ; 2.5,0 67.5,0 ; 2.5,115 44,115 ; 2.5,115 44,115 ; 44,115 cw(c44,112.5) 46.5,112.5 ; 44,115 cw(c44,112.5) 46.5,112.5 ; 46.5,112.5 46.5,102.5 ccw(c47.5,102.5) 47.5,101.5 67.5,101.5 ; 67.5,0 ccw(c67.501,2.499) 70,2.5 ; 67.5,0 ccw(c67.501,2.499) 70,2.5 ; 67.5,101.5 cw(c67.5,99) 70,99 ; 67.5,101.5 cw(c67.5,99) 70,99 ; 70,2.5 70,99
Engineering Notes:
  drawing of 17536 lines, arcs and shapes, not listed